# Altium PCB ePBR25_ACU_Latching_rev0.PcbDoc (part 3 of 3)
Units mil, origin at the board's own origin, x right, y up, seen from the top; angles counter-clockwise.
Board outline 2203 x 2390 mil, 2 copper layers (Top Layer, Bottom Layer); 131 components, 88 nets, 367 pads, 243 vias.
Unrouted connection lines stored in the file: 94.
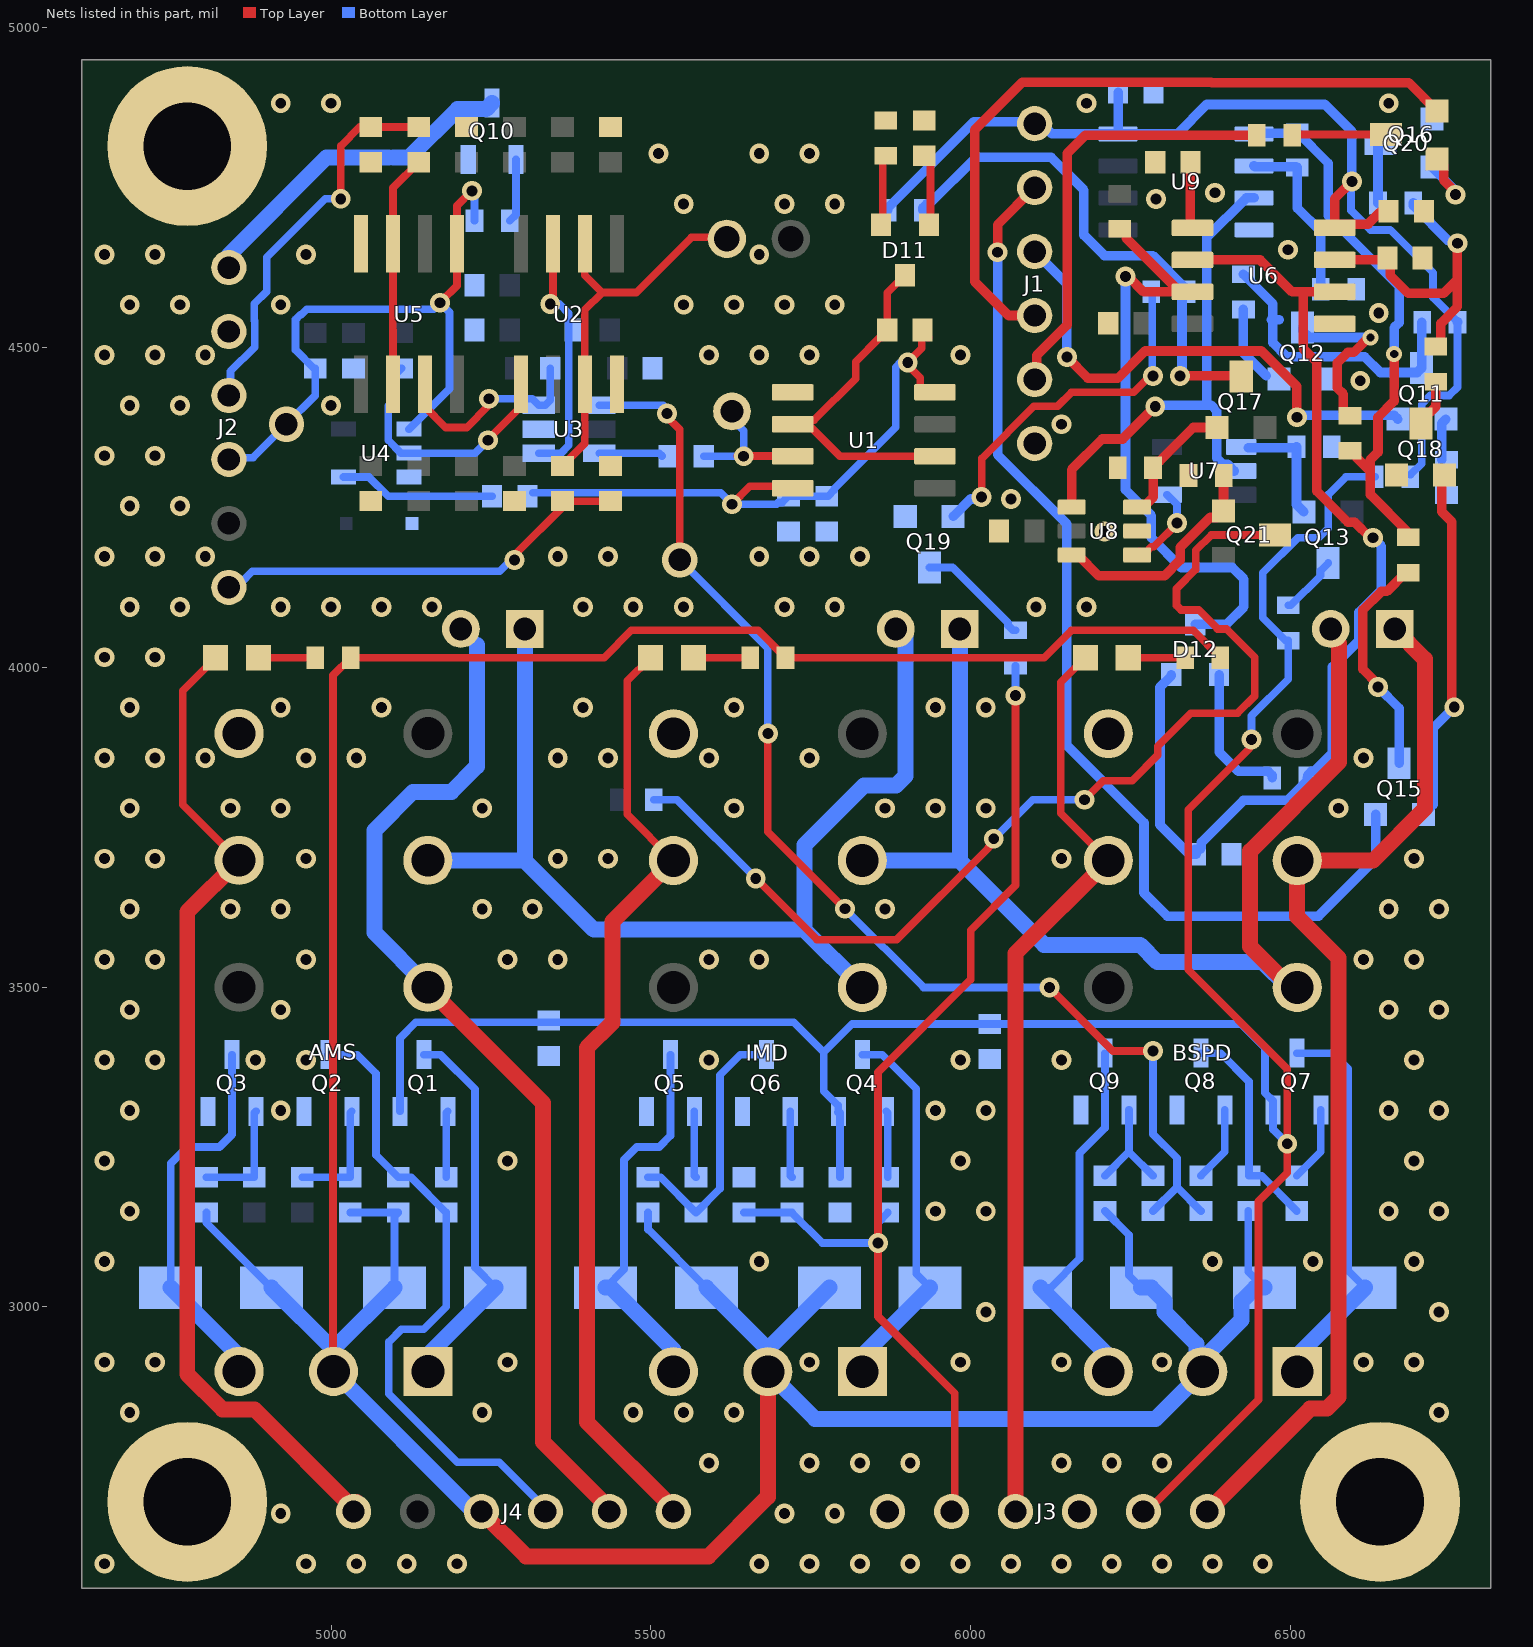
[diagram p2: the nets of this part, all layers, seen from the top]

## Via types
v1: diameter 31, hole 17, Top Layer to Bottom Layer, 236 vias
v2: diameter 55, hole 35, Top Layer to Bottom Layer, 3 vias
v3: diameter 25, hole 13, Top Layer to Bottom Layer, 2 vias
v4: diameter 40, hole 24, Top Layer to Bottom Layer, 1 vias
v5: diameter 36, hole 20, Top Layer to Bottom Layer, 1 vias

## Nets (pads, with @x,y where several pads share a name; then routed paths per layer and width w, separated by ;. In a path a pad name is that pad's centre, name@x,y a point inside that pad or via, vN(x,y) a via of type N, cw(c..) or ccw(c..) an arc to the next point about the centre after c; other vN are vias at no path point) (continued)
ACU_PWR: C7.1 C13.2 J1.A1 R49.1 R53.2 R56.2 U6.4 U9.8 | length 1727
  Top Layer w12: C7.1@6639.44,4711.03 C7.1@6639.44,4713
  Top Layer w15: U6.4@6569.22,4687 6569.22,4732.86 6596,4759.64 v1(6596,4759.82) ; U6.4@6573.06,4693 6621.41,4693 C7.1@6639.44,4711.03
  Bottom Layer w12: J1.A1@6086.81,4853.3 6090.11,4850 J1.A1@6100,4850 ; R53.2@6687.56,4301 6705,4318.44 6705,4411.45 6718.64,4425.08 6748.37,4425.08 6761.06,4437.78 R49.1@6761.06,4539.72
  Bottom Layer w12.5: v1@6594.47,4758.29 6594.47,4714.53 6625,4684 6655.96,4684 6723.06,4616.89 6723.06,4578.35 R49.1@6761.06,4540.35
  Bottom Layer w15: R56.2@5870.31,4714.53 5870.31,4718.47 6005.14,4853.3 J1.A1@6086.81,4853.3 ; J1.A1@6100,4850 6110.82,4850 6126.82,4834 U9.8@6230.4,4834 U9.8@6230.55,4834.14 ; C13.2@6230.55,4899 U9.8@6230.55,4834.14 ; v1@6594.47,4758.29 v1(6596,4759.82) 6596,4837.75 6553.75,4880 6369,4880 6323.14,4834.14 U9.8@6230.55,4834.14 ; R49.1@6761.06,4539.72 R49.1@6761.06,4540.35
AMBER_LED_GND: J1.A4 Q16.3 | length 1124
  Top Layer w15: J1.A4@6100,4550 6059.21,4550 6006.21,4603 6006.21,4840.21 6080.84,4914.84 6376.35,4914.84 6377.19,4914 6685,4914 Q16.3@6728.12,4870.88
AMS_ERR_PIN: AMS.A2 D4.1 Q3.3 | length 631.3
  Bottom Layer w12: D4.1@4749.13,3030 4749.13,3224.13 4775,3250 4825.46,3250 4845,3269.54 Q3.3@4845,3394.29 ; AMS.A2@4830.46,2899.21 AMS.A2@4852.87,2899.21
  Bottom Layer w25: D4.1@4749.13,3030 4855.23,2923.9 AMS.A2@4855.23,2898.65
AMS_LED: AMS.21 D2.2 J4.A1 | length 1579.8
  Top Layer w12: D2.2@4819.4,4015 4767.87,3963.47 4767.87,3785.23 AMS.21@4855.23,3697.87
  Top Layer w25: AMS.21@4855.23,3697.87 4775,3617.64 4775,2895 4830.5,2839.5 4880.5,2839.5 5040,2680 J4.A1@5040,2695
AMS_OK: J4.A4 Q2.3 R2.2 R4.1 | length 1022.3
  Bottom Layer w12: Q2.3@4995,3394.29 5040.71,3394.29 5070,3365 5070,3237.56 R2.2@5105,3202.56 5124.88,3202.56 R4.1@5180,3147.44 5180,3000 5145,2965 5110,2965 5090,2945 5090,2864 5197,2757 5263,2757 J4.A4@5335,2685
AMS_RST_PIN: AMS.A1 D3.1 Q1.3 | length 601
  Bottom Layer w12: Q1.3@5145,3394.29 5170.94,3394.29 5225,3340.23 5225,3061.61 D3.1@5256.61,3030
  Bottom Layer w25: AMS.A1@5150.5,2898.65 5150.5,2923.9 D3.1@5256.61,3030
AMS_STATE: Q21.2 R62.1 U8.6 | length 362.4
  Top Layer w15: U8.6@6157.71,4175.65 6167.56,4175.65 6200.21,4143 6303.01,4143 6327.56,4167.55 6327.56,4187.38 6374.43,4234.25 6384.97,4234.25 6395.24,4244.51 R62.1@6395.24,4302.2
B\S\P\D\_\O\K\: R19.1 R22.1 U3.4 | length 1923.3
  Top Layer w12: v1(5525,4396.93) 5525,4391.79 5545,4371.79 v2(5545,4168) ; v1(5682.87,3896.29) 5682.87,3742.83 v1(5803.25,3622.44) ; v1(6123.06,3499.44) 6222.5,3400 v1(6285,3400)
  Bottom Layer w12: U3.4@5418.99,4409.72 5419.13,4409.86 5519.01,4409.86 5531.93,4396.93 v1(5525,4396.93) ; v2(5545,4168) 5682.87,4030.13 v1(5682.87,3896.29) ; v1(5803.25,3622.44) 5926.25,3499.44 v1(6123.06,3499.44) ; R22.1@6285,3149.87 6322.6,3187.47 ; v1(6285,3400) 6285,3270 6322.6,3232.4 6322.6,3187.47 ; R19.1@6360,3149.87 6322.6,3187.27 6322.6,3187.47
BRAKE_COMP: R41.1 U5.3 U5.6 | length 364.2
  Top Layer w12: U5.6@5096.75,4442.32 5096.75,4527.95 5096.5,4528.19 5096.5,4551.81 5096.75,4552.05 U5.3@5096.75,4662.32 5096.75,4749.76 R41.1@5136.75,4789.76
BRAKE_LIGHT_GND: J2.A6 Q10.3 | length 522.4
  Bottom Layer w25: J2.A6@4840,4625 4840,4644.5 4992.72,4797.22 5090.03,4797.22 ; 5097.49,4797.22 5122.22,4797.22 5197.91,4872.91 5242.17,4872.91 Q10.3@5251.74,4882.49
BRAKE_OC: R47.1 U3.3 U5.7 | length 326.4
  Top Layer w12: U5.7@5146.75,4442.32 5146.75,4407.32 5179.19,4374.88 5211.9,4374.88 5246.75,4409.72 v1(5246.75,4420)
  Bottom Layer w12: v1(5246.75,4420) 5314.23,4420 U3.3@5324.5,4409.72 5334.78,4409.72 5342.56,4417.5 R47.1@5342.56,4467.44
BRAKE_PRESS: J2.A3 R45.1 R46.1 U4.1 U5.1 | length 1015.4
  Top Layer w12: v1@5173.21,4573.21 5196.75,4596.75 U5.1@5196.75,4662.32 5196.75,4721.75 v1(5220,4745)
  Bottom Layer w12: J2.A3@4840,4325 4842.67,4327.67 4877.67,4327.67 v2(4930,4380) 4975,4425 R46.1@4975,4467.44 4973.03,4467.44 4944.28,4496.19 4944.28,4543.69 4951.9,4551.31 4953.18,4551.31 4961.87,4560 5160,4560 v1(5170,4570) 5185,4555 5185,4435.58 U4.1@5121.74,4372.32 ; v1(5220,4745) 5224.19,4740.81 R45.1@5224.19,4698.2
BRAKE_SENS: J2.A4 R41.2 R42.2 | length 616.3
  Top Layer w12: v1(5015,4732.5) 5015,4815 5044.88,4844.88 R42.2@5061.75,4844.88 R41.2@5136.75,4844.88
  Bottom Layer w12: J2.A4@4842.5,4422.5 4842.5,4462.62 4880.5,4500.62 4880.5,4541.78 4880,4542.28 4880,4568.13 4899.5,4587.63 4899.5,4641.06 4990.94,4732.5 v1(5015,4732.5) v1@5018.7,4732.5
BSPD_ERR_PIN: BSPD.A2 D10.1 Q9.3 | length 593.1
  Bottom Layer w12: D10.1@6109.13,3030 6125,3030 6170,3075 6170,3239.79 6210,3279.79 Q9.3@6210,3396.72
  Bottom Layer w25: D10.1@6109.13,3030 6215.23,2923.9 BSPD.A2@6215.23,2898.65
BSPD_LED: BSPD.21 D8.2 J3.A4 | length 1441.8
  Top Layer w12: D8.2@6179.4,4015 6141,3976.6 6141,3772.09 BSPD.21@6215.23,3697.87
  Top Layer w25: J3.A4@6070,2680 6070,3552.64 BSPD.21@6215.23,3697.87
BSPD_OK: Q8.3 R17.2 R18.1 | length 338.6
  Bottom Layer w12: Q8.3@6360,3396.72 6390.71,3396.72 6435,3352.43 R17.2@6435,3204.99 6454.88,3204.99 R18.1@6510,3149.87
BSPD_RST_PIN: BSPD.A1 D9.1 Q7.3 | length 618.8
  Bottom Layer w12: Q7.3@6510,3396.72 6565.72,3396.72 6590,3372.44 6590,3056.61 D9.1@6616.61,3030
  Bottom Layer w25: BSPD.A1@6510.5,2898.65 6510.5,2923.9 D9.1@6616.61,3030
CRIT_ERR: U7.2 U8.4 U9.3 | length 802.7
  Top Layer w15: U8.4@6157.71,4250.46 6157.71,4309.07 6205.65,4357.01 6237.45,4357.01 v1(6288.44,4408)
  Bottom Layer w15: v1(6288.44,4408) 6290.16,4409.72 6369,4409.72 ; U7.2@6411.95,4307 6411.95,4307.3 6402.14,4317.11 6394.57,4317.11 6384.95,4326.72 6384.95,4400.94 6376.16,4409.72 6369,4409.72 ; U9.3@6443,4734 6431,4734 6369,4672 6369,4409.72
CRIT_ERR_OUT: R60.2 R64.1 R66.1 U9.1 | length 851
  Top Layer w15: R66.1@6593,4338.44 6596.94,4338.44 6603.22,4332.16 6603.22,4328.22 6625,4306.44 ; v3(6662,4490) 6662,4416.12 6636.88,4391 6636.88,4336.52 6625,4324.64 6625,4306.44 ; R64.1@6684.11,4211.06 6625,4270.16 6625,4306.44
  Bottom Layer w15: U9.1@6443,4834 6444.33,4835.33 6509.17,4835.33 R60.2@6510.5,4836.67 6559,4788.17 6559,4706 6670,4595 6670,4539.14 6662,4531.14 v3(6662,4490)
CURR_OC: R34.1 U2.7 U3.1 | length 389.6
  Top Layer w12: v1(5342.56,4568.13) 5346.75,4572.32 U2.7@5346.75,4662.32
  Bottom Layer w12: U3.1@5324.5,4334.92 5359.34,4334.92 5371.75,4347.32 5371.75,4553.25 5356.87,4568.13 v1(5342.56,4568.13)
CURR_TRIG: R33.1 U2.1 U4.2 | length 411.8
  Top Layer w12: v1(5245,4355) 5245,4355.58 5296.75,4407.32 U2.1@5296.75,4442.32
  Bottom Layer w12: R33.1@5110,4467.44 5098.28,4455.72 5098.28,4417.98 5089.06,4408.76 5089.06,4355.13 5109.27,4334.92 U4.2@5121.74,4334.92 5224.92,4334.92 v1(5245,4355) v1@5238.3,4361.7
GND: AMS.24 BSPD.24 C2.2 C3.2 C4.2 C5.2 C6.2 C7.2 C8.1 C9.2 C10.1 C11.2 C12.2 C13.1 D1.1 IMD.24 J1.A6 J2.A5 J3.A3 J3.A6 pad.9 Q2.2 Q3.2 Q5.2 Q6.2 Q8.2 Q9.2 Q10.2 Q12.2 Q18.2 Q19.2 Q20.2 R6.1 R11.1 R15.2 R20.1 R25.1 R26.1 R29.1 R30.1 R31.1 R32.1 R42.1 R43.1 R44.1 R52.1 R55.2 R59.2 R61.2 R62.2 U1.1 U2.4 U3.2 U4.3 U5.4 U6.1 U8.2 U9.4
  other v1: 4645.67,2598.43 4960.63,2598.43 5039.37,2598.43 5118.11,2598.43 5196.85,2598.43 5669.29,2598.43 5748.03,2598.43 5826.77,2598.43 5905.52,2598.43 5984.26,2598.43 6063,2598.43 6141.74,2598.43 6220.48,2598.43 6299.22,2598.43 6377.96,2598.43 6456.7,2598.43 4921.26,2677.17 5708.66,2677.17 5787.4,2677.17 5590.55,2755.91 5748.03,2755.91 5826.77,2755.91 5905.52,2755.91 6141.74,2755.91 6220.48,2755.91 6299.22,2755.91 4685.04,2834.65 5236.22,2834.65 5472.44,2834.65 5551.18,2834.65 5629.92,2834.65 6732.29,2834.65 4645.67,2913.39 4724.41,2913.39 5275.59,2913.39 5748.03,2913.39 5984.26,2913.39 6141.74,2913.39 6299.22,2913.39 6614.18,2913.39 6692.92,2913.39 6023.63,2992.13 6732.29,2992.13 4645.67,3070.87 5669.29,3070.87 6377.96,3070.87 6535.44,3070.87 6692.92,3070.87 4685.04,3149.61 5944.89,3149.61 6023.63,3149.61 6653.55,3149.61 6732.29,3149.61 4645.67,3228.35 5275.59,3228.35 5984.26,3228.35 6692.92,3228.35 4685.04,3307.09 4921.26,3307.09 5944.89,3307.09 6023.63,3307.09 6653.55,3307.09 6732.29,3307.09 4645.67,3385.83 4724.41,3385.83 4881.89,3385.83 4960.63,3385.83 5590.55,3385.83 5984.26,3385.83 6141.74,3385.83 6692.92,3385.83 4685.04,3464.57 4921.26,3464.57 6653.55,3464.57 6732.29,3464.57 4645.67,3543.31 4724.41,3543.31 4960.63,3543.31 5275.59,3543.31 5354.33,3543.31 5590.55,3543.31 5669.29,3543.31 6614.18,3543.31 6692.92,3543.31 4685.04,3622.05 4842.52,3622.05 4921.26,3622.05 5236.22,3622.05 5314.96,3622.05 5866.14,3622.05 6653.55,3622.05 6732.29,3622.05 4645.67,3700.79 4724.41,3700.79 4960.63,3700.79 5354.33,3700.79 5433.07,3700.79 6141.74,3700.79 6692.92,3700.79 4685.04,3779.53 4842.52,3779.53 4921.26,3779.53 5236.22,3779.53 5629.92,3779.53 5866.14,3779.53 5944.89,3779.53 6023.63,3779.53 6574.81,3779.53 4645.67,3858.27 4724.41,3858.27 4803.15,3858.27 4960.63,3858.27 5039.37,3858.27 5354.33,3858.27 5433.07,3858.27 5590.55,3858.27 5748.03,3858.27 6614.18,3858.27 4685.04,3937.01 4921.26,3937.01 5078.74,3937.01 5393.7,3937.01 5629.92,3937.01 5944.89,3937.01 6023.63,3937.01 4645.67,4015.75 4724.41,4015.75 4685.04,4094.49 4763.78,4094.49 4921.26,4094.49 5000,4094.49 5078.74,4094.49 5157.48,4094.49 5393.7,4094.49 5472.44,4094.49 5551.18,4094.49 5708.66,4094.49 5787.4,4094.49 6102.37,4094.49 6181.11,4094.49 4645.67,4173.23 4724.41,4173.23 4803.15,4173.23 5354.33,4173.23 5433.07,4173.23 5669.29,4173.23 5748.03,4173.23 5826.77,4173.23 6209.15,4212.44 4685.04,4251.97 4763.78,4251.97 6063,4263.1 4645.67,4330.71 4724.41,4330.71 6141.74,4380 4685.04,4409.45 4763.78,4409.45 5000,4409.45 6609,4448 4645.67,4488.19 4724.41,4488.19 4803.15,4488.19 5590.55,4488.19 5669.29,4488.19 5748.03,4488.19 5984.26,4488.19 6638,4554 4685.04,4566.93 4763.78,4566.93 4921.26,4566.93 5551.18,4566.93 5629.92,4566.93 5708.66,4566.93 5787.4,4566.93 4645.67,4645.67 4724.41,4645.67 4960.63,4645.67 5669.29,4645.67 6496,4652.87 5551.18,4724.41 5708.66,4724.41 5787.4,4724.41 6289.6,4732.32 6382,4742 5511.81,4803.15 5669.29,4803.15 5748.03,4803.15 4921.26,4881.89 5000,4881.89 6181.11,4881.89 6653.55,4881.89
GREEN_LED_GND: J1.A3 Q11.3 | length 809.8
  Top Layer w15: v1(6150.36,4484.95) 6183.31,4452 6213.23,4452 6213.56,4451.68 6229.88,4451.68 6272.7,4494.5 6454.5,4494.5 6510,4439 v1(6510,4391)
  Bottom Layer w15: J1.A3@6100,4650 6150.36,4599.64 v1(6150.36,4484.95) ; v1(6510,4391) 6513.06,4394.06 6661.94,4394.06 Q11.3@6668,4388
IMD_ERR_PIN: D7.1 IMD.A2 Q5.3 | length 607.2
  Bottom Layer w12: D7.1@5429.13,3030 5457.87,3058.74 5457.87,3230 5477.87,3250 5512.87,3250 5530.5,3267.64 Q5.3@5530.5,3394.29
  Bottom Layer w25: D7.1@5429.13,3030 5437.87,3030 5535.23,2932.64 IMD.A2@5535.23,2898.65
IMD_LED: D6.2 IMD.21 J4.A6 | length 1490.4
  Top Layer w12: D6.2@5499.4,4015 5463.09,3978.69 5463.09,3770 IMD.21@5535.23,3697.87
  Top Layer w25: IMD.21@5535.23,3697.87 5440,3602.64 5440,3445 5400,3405 5400,2820 J4.A6@5537.5,2682.5
IMD_OK: J3.A5 R10.1 R14.2 R15.1 R67.1 | length 1744.3
  Top Layer w12: J3.A5@5975,2680 5975,2865 5855,2985 v1(5855,3100) 5855,3367 6000,3512 6000,3589 6070,3659 v1(6070,3955.66)
  Bottom Layer w12: R15.1@5645.5,3147.44 R14.2@5720.5,3147.44 5767.94,3100 v1(5855,3100) 5855,3131.94 R10.1@5870.5,3147.44 ; v1(6070,3955.66) R67.1@6070,4002.57
IMD_RST_PIN: D5.1 IMD.A1 Q4.3 | length 601.8
  Bottom Layer w12: Q4.3@5830.5,3394.29 5861.75,3394.29 5915,3341.04 5915,3051.61 D5.1@5936.61,3030
  Bottom Layer w25: IMD.A1@5830.5,2898.65 5830.5,2923.9 D5.1@5936.61,3030
IMD_STATE: Q17.2 R59.1 U8.3 | length 198.4
  Top Layer w15: U8.3@6260.07,4250.46 6269.92,4250.46 6285.62,4266.16 6285.62,4298.46 R59.1@6289.6,4302.44 ; R59.1@6285,4312 6285,4315.94 6291.28,4322.22 6295.22,4322.22 6348,4375 Q17.2@6385,4375
LATCH_RST: J3.A2 Q1.2 Q4.2 Q7.2 R6.2 R11.2 R20.2 R53.1 R54.1 | length 3875
  Top Layer w12: J3.A2@6275,2680 6450,2855 6450,3165 6495,3210 v1(6495,3255) 6495,3371.89 6340,3526.89 6340,3777.04 6435.36,3872.41 6435.36,3883.36 v1(6439,3887)
  Bottom Layer w12: Q1.2@5107.6,3305.71 5107.6,3420 5132.6,3445 5340,3445 5723.25,3445 5770.44,3397.82 ; Q4.2@5792.62,3304.27 5795.5,3303.31 R11.2@5795.5,3202.56 ; Q4.2@5793.1,3305.71 5793.1,3314.76 5770.44,3337.43 5770.44,3397.82 ; v1(6439,3887) 6439,3924 6496.49,3981.49 R54.1@6496.49,4041.8 6492.56,4041.8 6456.85,4077.51 6456.85,4147.69 6511.75,4202.59 6543.9,4202.59 6559,4217.69 6559,4270.13 6586.87,4298 R53.1@6632,4298 ; v1(6495,3255) 6472.6,3277.4 Q7.2@6472.6,3308.14 6472.6,3322.4 6460,3335 6460,3405 6422.62,3442.38 5815,3442.38 5770.44,3397.82
LATCHING_Delayed: AMS.A3 BSPD.A3 D3.2 D4.2 D5.2 D7.2 D9.2 D10.2 IMD.A3 J4.A3 R1.2 R2.1 R3.1 R7.1 R9.2 R12.1 R16.2 R17.1 R21.1 | length 6063.6
  Top Layer w12: AMS.A3@5002.87,2898.65 5002.87,3987.44 R1.2@5030.43,4015 5426.75,4015 5469.46,4057.71 5667.71,4057.71 R9.2@5710.43,4015 6115,4015 6157.71,4057.71 6347.71,4057.71 R16.2@6390.43,4015
  Top Layer w25: J4.A3@5235,2680 5305,2610 5590,2610 5682.87,2702.87 IMD.A3@5682.87,2898.65
  Bottom Layer w12: R7.1@4805,3147.44 4805,3131.61 D4.2@4906.61,3030 ; R3.1@5030,3147.44 R2.1@5105,3147.44 5099.13,3141.57 D3.2@5099.13,3030 ; R12.1@5495.5,3147.44 5495.5,3121.1 D7.2@5586.61,3030 ; R21.1@6210,3149.87 6247.4,3112.47 6247.4,3049.2 D10.2@6266.61,3030 ; R17.1@6434,3149.87 6434,3055.13 D9.2@6459.13,3030
  Bottom Layer w25: D4.2@4906.61,3030 AMS.A3@5002.87,2933.74 ; AMS.A3@5002.87,2898.65 AMS.A3@5002.87,2933.74 ; AMS.A3@5003.64,2899 5216.9,2685.74 5229.26,2685.74 J4.A3@5235,2680 ; D3.2@5099.13,3030 AMS.A3@5002.87,2933.74 ; D7.2@5586.61,3030 IMD.A3@5682.87,2933.74 ; D5.2@5779.13,3030 IMD.A3@5682.87,2933.74 ; D10.2@6266.61,3030 6282.35,3030 6303.32,3009.04 6303.32,2991.61 6352.96,2941.96 6352.96,2922.57 6356.66,2918.87 6362.87,2918.87 BSPD.A3@6362.87,2898.65 6289.21,2825 5756.52,2825 IMD.A3@5682.87,2898.65 IMD.A3@5682.87,2933.74 ; BSPD.A3@6370.3,2926.3 6423.71,2979.71 6423.71,3009.04 6444.67,3030 D9.2@6459.13,3030
NetBSPD_TIME1_1: BSPD_TIME1.1 R27.2 U1.3 | length 227
  Top Layer w12: v1@5635,4330.47 5721.18,4330.47 U1.3@5721.65,4330
  Bottom Layer w12: R27.2@5582.56,4330 v1(5645,4330) 5645,4369.56 5626.75,4387.82 BSPD_TIME1.1@5626.75,4400.12
NetC8_2: C8.2 U6.5 | length 104.1
  Top Layer w15: C8.2@6343.56,4789.76 6343.56,4690.22 U6.5@6346.78,4687
NetD2_1: D2.1 R1.1 | length 89
  Top Layer w12: D2.1@4886.33,4015 R1.1@4975.31,4015
NetD6_1: D6.1 R9.1 | length 89
  Top Layer w12: D6.1@5566.33,4015 R9.1@5655.31,4015
NetD8_1: D8.1 R16.1 | length 89
  Top Layer w12: D8.1@6246.33,4015 R16.1@6335.31,4015
NetD11_1: D11.1 R32.2 | length 109.1
  Top Layer w12: D11.1@5934.5,4691.77 5937.1,4694.37 R32.2@5937.1,4799.84
NetD11_2: D11.2 R31.2 | length 109.1
  Top Layer w12: D11.2@5859.7,4691.77 5862.29,4694.37 R31.2@5862.29,4799.84
NetD12_1: D12.1 R50.2 | length 223.4
  Bottom Layer w15: D12.1@6388.4,3988.63 6388.4,3867.31 6418.49,3837.22 6465.16,3837.22 6471.44,3830.94 R50.2@6471.44,3827
NetD12_3: D12.3 R48.2 U6.7 | length 981.9
  Top Layer w15: R48.2@6232.79,4685.44 6236.73,4685.44 6243.01,4679.16 6243.01,4671.08 6321.8,4592.3 U6.7@6327.09,4587 ; v1(6241.99,4611.06) 6246.32,4611.06 6270.38,4587 U6.7@6327.09,4587 ; U6.7@6346.78,4587 U6.7@6327.09,4587
  Bottom Layer w15: v1(6241.99,4611.06) 6241.99,4277.57 6282.44,4237.12 6282.44,4202.59 6329.03,4156 6408.94,4156 6427,4137.94 6427,4094.38 6399.99,4067.37 D12.3@6351,4067.37
NetQ1_1: Q1.1 R4.2 | length 104.1
  Bottom Layer w12: R4.2@5180,3202.56 5180,3303.31 Q1.1@5182.4,3305.71
NetQ2_1: Q2.1 R3.2 R5.2 | length 179.1
  Bottom Layer w12: R5.2@4955,3202.56 R3.2@5030,3202.56 5030,3303.31 Q2.1@5032.4,3305.71
NetQ3_1: Q3.1 R7.2 R8.2 | length 179.1
  Bottom Layer w12: R7.2@4805,3202.56 R8.2@4880,3202.56 4880,3303.31 Q3.1@4882.4,3305.71
NetQ4_1: Q4.1 R10.2 | length 104.2
  Bottom Layer w12: Q4.1@5867.91,3305.71 5870.5,3303.11 R10.2@5870.5,3202.56
NetQ5_1: Q5.1 R13.1 | length 104.2
  Bottom Layer w12: Q5.1@5567.91,3305.71 5567.91,3205.16 R13.1@5570.5,3202.56
NetQ6_1: Q6.1 R14.1 | length 104.2
  Bottom Layer w12: Q6.1@5717.91,3305.71 5717.91,3205.16 R14.1@5720.5,3202.56
NetQ6_3: Q6.3 R12.2 R13.2 | length 414.1
  Bottom Layer w12: R12.2@5495.5,3202.56 5515.39,3202.56 R13.2@5570.5,3147.44 5607.87,3184.8 5607.87,3362.36 5639.8,3394.29 Q6.3@5680.5,3394.29
NetQ7_1: Q7.1 R18.2 | length 118.6
  Bottom Layer w12: R18.2@6510,3204.99 6547.4,3242.39 Q7.1@6547.4,3308.14
NetQ8_1: Q8.1 R19.2 | length 118.6
  Bottom Layer w12: R19.2@6360,3204.99 6397.4,3242.39 Q8.1@6397.4,3308.14
NetQ9_1: Q9.1 R21.2 R22.2 | length 171.8
  Bottom Layer w12: R21.2@6210,3204.99 6247.4,3242.39 6247.4,3242.59 ; Q9.1@6247.4,3308.14 6247.4,3242.59 ; R22.2@6285,3204.99 6247.4,3242.59
NetQ10_1: Q10.1 R45.2 | length 99.8
  Bottom Layer w12: R45.2@5279.3,4698.2 5289.15,4708.04 Q10.1@5289.15,4793.91
NetQ11_1: Q11.1 R49.2 R51.2 | length 465
  Bottom Layer w15: R51.2@6426.44,4614.56 6472.28,4568.72 6472.28,4543.56 ; 6469.94,4543.56 6472.28,4543.56 ; 6482.44,4543.56 6472.28,4543.56 ; R49.2@6705,4539.72 Q11.1@6705,4468 6698,4461 6640.55,4461 6616.05,4485.5 6494.5,4485.5 6472.28,4507.72 6472.28,4543.56
NetQ11_2: Q11.2 R52.2 | length 66
  Bottom Layer w15: R52.2@6736.72,4324.56 6736.72,4381.72 Q11.2@6743,4388
NetQ12_1: Q12.1 R66.2 | length 276.4
  Top Layer w15: R66.2@6593,4393.56 6589.06,4393.56 6582.78,4399.84 6582.78,4427.07 6573.06,4436.8 6573.06,4475.78 6589.84,4492.56 6599.17,4492.56 6622.29,4515.69 v3(6625,4515.69)
  Bottom Layer w15: Q12.1@6519,4531 6519,4526.19 6529.5,4515.69 v3(6625,4515.69)
NetQ12_3: Q12.3 R51.1 | length 118.6
  Bottom Layer w15: R51.1@6426.44,4559.44 6426.44,4491.56 6462.28,4455.72
NetQ13_1: Q13.1 R54.2 | length 94.3
  Bottom Layer w12: R54.2@6496.49,4096.92 6500.43,4096.92 6547,4143.49 6547,4151 Q13.1@6559,4163
NetQ15_1: Q15.1 R64.2 | length 358.6
  Top Layer w15: v1(6636.88,3969.06) 6636.88,3973.39 6613,3997.27 6613,4089.7 6641.98,4118.67 6650.75,4118.67 6680.17,4148.1 R64.2@6684.11,4148.1
  Bottom Layer w15: v1(6636.88,3969.06) 6670,3935.94 Q15.1@6670,3850
NetQ15_2: Q15.2 Q18.3 | length 569.3
  Top Layer w15: Q18.3@6736.72,4311.4 6736.72,4243 6752,4227.72 6752,3941.68 v1(6756.01,3937.68)
  Bottom Layer w15: Q15.2@6708,3770 6723.06,3785.06 6723.06,3904.73 v1(6756.01,3937.68)
NetQ16_1: Q16.1 R65.2 | length 148.9
  Top Layer w12: R65.2@6503.03,4840.14 6510.17,4833 Q16.1@6649,4833
NetQ16_2: Q16.2 Q20.3 | length 126.3
  Top Layer w15: Q16.2@6729,4795 6739.5,4784.5 6739.5,4761.83 6758,4743.33 v1(6758,4739)
  Bottom Layer w15: Q20.3@6721,4782 6754.94,4748.06 6754.94,4742.06 v1(6758,4739)
NetQ17_1: Q17.1 R56.1 R57.2 | length 810.8
  Top Layer w15: v1(6327.29,4455.72) 6422.28,4455.72 Q17.1@6423,4455
  Bottom Layer w15: R56.1@5925.43,4714.53 5925.43,4718.47 5931.7,4724.75 5935.64,4724.75 6008.11,4797.22 6125.91,4797.22 6177,4746.13 6177,4675.75 6209.15,4643.6 6284.9,4643.6 6337.56,4590.94 R57.2@6337.56,4587 6330.35,4579.79 6330.35,4458.79 v1(6327.29,4455.72)
NetQ18_1: Q18.1 R58.2 | length 77.1
  Top Layer w15: Q18.1@6704,4381 6704,4388 6714.5,4398.5 6718.21,4398.5 6727,4407.29 R58.2@6727,4446.44
NetQ19_1: Q19.1 R67.2 | length 177.4
  Bottom Layer w12: Q19.1@5935.64,4156 5971.64,4156 6058.28,4069.36 6058.28,4065.47 6066.06,4057.69 R67.2@6070,4057.69
NetQ19_3: Q19.3 R57.1 | length 571
  Top Layer w12: v1(6017,4266.16) 6017,4326.4 6098.6,4408 6135.71,4408 6157.71,4430 6254.86,4430 6280.59,4455.72 v1(6285,4455.72)
  Bottom Layer w12: R57.1@6282.44,4587 6283.72,4585.72 6283.72,4457 v1(6285,4455.72)
  Bottom Layer w15: Q19.3@5972.64,4236 5999.74,4263.1 6013.94,4263.1 v1(6017,4266.16)
NetQ20_1: Q20.1 R63.2 | length 94.7
  Bottom Layer w15: R63.2@6636.88,4726 6636.88,4814.88 Q20.1@6641,4819
NetQ21_1: Q21.1 R68.2 | length 1648.3
  Top Layer w12: v1(5663.9,3669.88) 5759.78,3574 5884,3574 6027.31,3717.31 6027.31,3718.17 6036,3726.86 v1(6036,3732) ; v1(6177.77,3793) 6207.33,3822.57 6252.36,3822.57 6292.66,3862.87 6292.66,3876.76 6343.91,3928 6417,3928 6444.18,3955.18 6444.18,4015.66 6399.84,4060 6386,4060 6356.3,4089.7 6328.83,4089.7 6321.8,4096.72 6321.8,4122.8 6352,4153 6352,4182.75 6376,4206.75 Q21.1@6475.47,4206.75
  Bottom Layer w12: R68.2@5504.56,3793 5540.78,3793 v1(5663.9,3669.88) ; v1(6036,3732) 6097,3793 v1(6177.77,3793)
NetR35_2: R35.2 U4.4 | length 244.8
  Bottom Layer w12: U4.4@5019.38,4297.52 5059.1,4297.52 5089.06,4267.56 R35.2@5251.75,4267.56
NetR60_1: R60.1 R61.1 U9.2 | length 274.4
  Bottom Layer w15: U9.2@6443,4784 6444.22,4782.78 6509.28,4782.78 R60.1@6510.5,4781.55 6510.5,4718.12 6547.44,4681.18 R61.1@6547.44,4591
RED_LED_GND: J1.A2 Q15.3 | length 1705.5
  Top Layer w15: v1(6042,4649) 6042,4692 J1.A2@6100,4750
  Bottom Layer w15: v1(6042,4649) 6042,4332.4 6150.36,4224.04 6150.36,3877.62 6271,3756.98 6271,3647.29 6307.29,3611 6544,3611 6633,3700 Q15.3@6633,3770
RST_INPUT: Q13.2 R55.1 U7.1 | length 182.2
  Bottom Layer w15: U7.1@6434,4343.51 R55.1@6509.44,4343.51 ; R55.1@6509.44,4345 R55.1@6509.44,4343.51 ; Q13.2@6521,4243 6509.44,4254.56 R55.1@6509.44,4343.51
RST_STATE: U7.4 U8.1 | length 134.1
  Top Layer w12: U8.1@6264.39,4179.97 6274.23,4179.97 6282.51,4188.25 6285.94,4188.25 6322.6,4224.91 v1(6322.6,4225.7)
  Top Layer w15: U8.1@6260.07,4175.65 U8.1@6264.39,4179.97
  Bottom Layer w12: U7.4@6306.93,4269.6 6322.6,4253.93 v1(6322.6,4225.7)
SCHT_AMS_IMD: AMS.11 IMD.12 JMP1.1 JMP2.2 | length 1704
  Top Layer w25: JMP2.2@5882.87,4060 JMP2.2@5897.87,4060
  Bottom Layer w25: AMS.11@5150.5,3697.87 5302.87,3697.87 ; JMP1.1@5302.87,4060 5302.87,3697.87 ; IMD.12@5830.5,3499.44 5739.94,3590 ; JMP2.2@5897.87,4060 5897.87,3830 5882.87,3815 5832.87,3815 5739.94,3722.08 5739.94,3590 ; 5302.87,3697.87 5410.73,3590 5739.94,3590
SCHT_IMD_BSPD: BSPD.12 IMD.11 JMP2.1 JMP3.2 | length 1784.5
  Top Layer w15: BSPD.12@6500.56,3499.44 BSPD.12@6510.5,3499.44
  Top Layer w25: BSPD.12@6500.56,3499.44 6436.75,3563.25 6436.75,3712.75 6576.09,3852.09 6576.09,4037.56 6562.87,4050.78 JMP3.2@6562.87,4060
  Bottom Layer w25: IMD.11@5830.5,3697.87 5982.87,3697.87 ; JMP2.1@5982.87,4060 5982.87,3697.87 ; BSPD.12@6510.5,3499.44 6496.49,3499.44 6456.85,3539.09 6291.91,3539.09 6265,3566 6114.73,3566 5982.87,3697.87
SCHT_IN_LATCH: AMS.12 J4.A5 JMP1.2 | length 1600.6
  Top Layer w25: AMS.12@5150.5,3499.44 5331,3318.94 5331,2789 J4.A5@5435,2685
  Bottom Layer w25: AMS.12@5150.5,3502.36 5067.87,3585 5067.87,3745 5127.87,3805 5187.87,3805 5227.87,3845 5227.87,4035
SCHT_OUT_LATCH: BSPD.11 J3.A1 JMP3.1 | length 1678.5
  Top Layer w25: J3.A1@6370,2680 6530.77,2840.77 6556.97,2840.77 6575,2858.8 6575,3545.68 6510.5,3610.17 BSPD.11@6510.5,3697.87 6535.73,3697.87 6629,3697.87 6710,3778.87 6710,4012.87 JMP3.1@6662.87,4060
THRES_BSPD: C1.1 D11.3 U1.2 U1.6 | length 566.9
  Top Layer w12: D11.3@5897.1,4613.03 5897.1,4611.06 5887.35,4601.32 5885.38,4601.32 5869.54,4585.47 C1.1@5869.54,4527.4 5869.54,4525.43 5859.79,4515.69 5857.82,4515.69 5820,4477.86 5820,4451.46 5755.33,4386.8 5728.44,4386.8 U1.2@5721.65,4380 5745.58,4380 5795.58,4330 U1.6@5944.09,4330
TIME_START: C1.2 C2.1 R29.2 R35.1 U1.4 U1.8 | length 999.1
  Top Layer w12: v1(5626.75,4255) 5654.6,4282.85 5718.8,4282.85 U1.4@5721.65,4280 ; C1.2@5934.4,4515.69 5924.66,4525.43 C1.2@5924.66,4527.4 5923.37,4526.12 5923.37,4498.71 5901.5,4476.85 v1(5901.5,4476.61) 5901.5,4472.59 5921.28,4452.8 5921.28,4436.8 5928.08,4430 U1.8@5944.09,4430
  Bottom Layer w12: R35.1@5315,4272.71 5609.04,4272.71 v1(5626.75,4255) 5696.25,4255 5699.06,4257.81 5705.25,4257.81 R29.2@5715,4267.56 C2.1@5775,4267.56 5776.97,4267.56 5786.72,4277.31 5786.72,4279.28 5882.87,4375.43 5882.87,4469.28 5890.2,4476.61 v1(5901.5,4476.61)
TIME_TRIG: R27.1 U3.6 | length 100.3
  Bottom Layer w12: U3.6@5418.99,4334.92 5512.99,4334.92 R27.1@5517.44,4330.47
TIMER_OUT: C9.1 R58.1 R63.1 U6.3 | length 516.9
  Top Layer w15: U6.3@6569.22,4637 6644.88,4637 C9.1@6650.88,4643 ; C9.1@6649,4643 6649.94,4642.06 6655.94,4636.06 6655.94,4612.78 6684.11,4584.61 6739.4,4584.61 6761,4606.21 ; R58.1@6727,4501.56 6728.78,4501.56 6735.06,4507.84 6735.06,4537.84 6761,4563.78 6761,4606.21 ; v1(6761,4663) 6761,4606.21
  Bottom Layer w15: R63.1@6691.99,4726 6691.99,4722.06 6748,4666.06 6757.94,4666.06 v1(6761,4663)
TRIG_TIMER: C11.1 D12.2 R50.1 U6.2 U6.6 | length 1659.8
  Top Layer w15: U6.6@6346.78,4637 6452.56,4637 6502.56,4587 6519.85,4587 ; U6.2@6569.22,4587 6519.85,4587 ; v1(6629,4202.59) 6624.67,4202.59 6600.4,4226.86 6589.56,4226.86 6541,4275.42 6541,4477.56 6519.85,4498.71 6519.85,4587
  Bottom Layer w15: D12.2@6313.6,3988.63 6313.6,3986.66 6296,3969.06 6296,3753.56 6342,3707.56 C11.1@6352.44,3707.56 ; C11.1@6350.25,3715.81 6358.72,3715.81 6360.69,3717.78 6360.69,3726.25 6426.44,3792 6495.5,3792 6526.56,3823.06 R50.1@6526.56,3827 ; R50.1@6526.89,3827.34 6526.89,3831.27 6532.84,3837.22 6536.78,3837.22 6565.72,3866.16 6565.72,4000.59 6606.89,4041.76 6606.89,4085.89 6642,4121 6642,4189.59 v1(6629,4202.59)
TS_ACTIVE: J1.A5 R65.1 | length 683
  Top Layer w15: J1.A5@6100,4450 6103.15,4453.15 6103.15,4487.56 6150.72,4535.14 6150.72,4803.37 6179.35,4832 R65.1@6447.44,4832
TS_CURR_COMP: R28.1 TEST1.2 U2.3 U2.6 | length 615.2
  Top Layer w12: R28.1@5361.75,4314.88 5396.75,4349.88 U2.3@5396.75,4442.32 5396.75,4558.96 5423.69,4585.91 ; U2.6@5396.75,4662.32 5396.75,4612.85 5423.69,4585.91 ; TEST1.2@5618.8,4672.4 5563.49,4672.4 5477,4585.91 5423.69,4585.91
TS_CURR_SENS: J2.A1 R28.2 R30.2 | length 659.7
  Top Layer w12: v1(5286.75,4168) 5290.38,4171.64 5290.38,4179.09 5361.75,4250.46 R28.2@5361.75,4259.76 R30.2@5436.75,4259.76
  Bottom Layer w12: J2.A1@4840,4135 4841.77,4133.23 4859.86,4133.23 4876.83,4150.2 5263.8,4150.2 5281.6,4168 v1(5286.75,4168)
pads on no net: AMS.14 AMS.22 BSPD.14 BSPD.22 IMD.14 IMD.22 U1.5 U1.7 U7.3 U7.5 U9.5 U9.6 U9.7

## Polygon pours and split planes (outlines as drawn)
GND on Bottom Layer "Bottom Layer-GND" (solid, pour order 5): 4622,2568 6803,2568 6803,4942 4622,4942
GND on Top Layer "Top Layer-GND" (solid, pour order 4): 4621,2567 6803,2567 6803,4940 4621,4940

## Silkscreen, mask and mechanical layers (free items; w line width, h text height)
Top Overlay:
  lines w10: 4875,4350 4890,4365
  text "LIGHT" at 4665,4599 h30
  text "SW" at 4742,4523 h30
  text "SENS" at 4691,4443 h30
  text "TSA" at 5970,4420 h35
  text "GND" at 5970,4340 h35
  text "PRESS" at 4645,4299 h30
  text "BSPD / TIME" at 5515,4272.52 h30
  text "5V" at 4730,4220 h30
  text "5V" at 5025,4165 h35
  text "BOKn" at 5573,4143 h35
  text "CURR" at 4680,4137.68 h30
  text "#LOCK_IN" at 4657,3882 h60 r270
  text "ePBR25_ACU_Latching_rev0" at 6723.06,3149.87 h35 r90
  text "UMSAE" at 6744,2846 h50 r90
  text "VS" at 5235,2721.49 h35
  text "IN" at 5410,2720 h35
  text "GND" at 5900,2720 h35 r90
  text "IOK" at 5995,2720 h35 r90
  text "ALED" at 4912.5,2718 h35
  text "AOKn" at 5078,2718 h35
  text "BLED" at 6019,2718 h35
  text "RST" at 6285,2715 h35 r90
  text "OUT" at 6405,2715 h35 r90
  text "GND" at 6200,2709 h35 r90
  text "AOK" at 5299,2611 h35
  text "ILED" at 5533,2601 h35
Bottom Overlay:
  drawing of 19 lines, arcs and shapes, not listed
  text "BSPD / TIME" at 5794.56,4346.22 h30
  text "5V" at 5000.01,4240.03 h35
  text "BOKn" at 5511.83,4146.28 h35
Board Outline:
  lines w10: 4611.94,4949.17 4611.94,2560 6810,2560 6810,4950 6780,4950 4611.94,4950

## Text inside footprints (layer, text, board x,y; h text height)
D1: Mechanical 1 "*" at 5098.62,4225 h31.25
U2: Top Overlay "*" at 5290,4390 h30 r90
U5: Top Overlay "*" at 5210,4695 h30 r270